# Altium PCB 2026.11.05.HMS.PD.CNHH.V6.0.PcbDoc (part 3 of 3)
Units mm, origin at the board's own origin, x right, y up, seen from the top; angles counter-clockwise.
Board outline 110 x 110 mm, 2 copper layers (Top Layer, Bottom Layer); 125 components, 86 nets, 366 pads, 882 vias.
Unrouted connection lines stored in the file: 779.
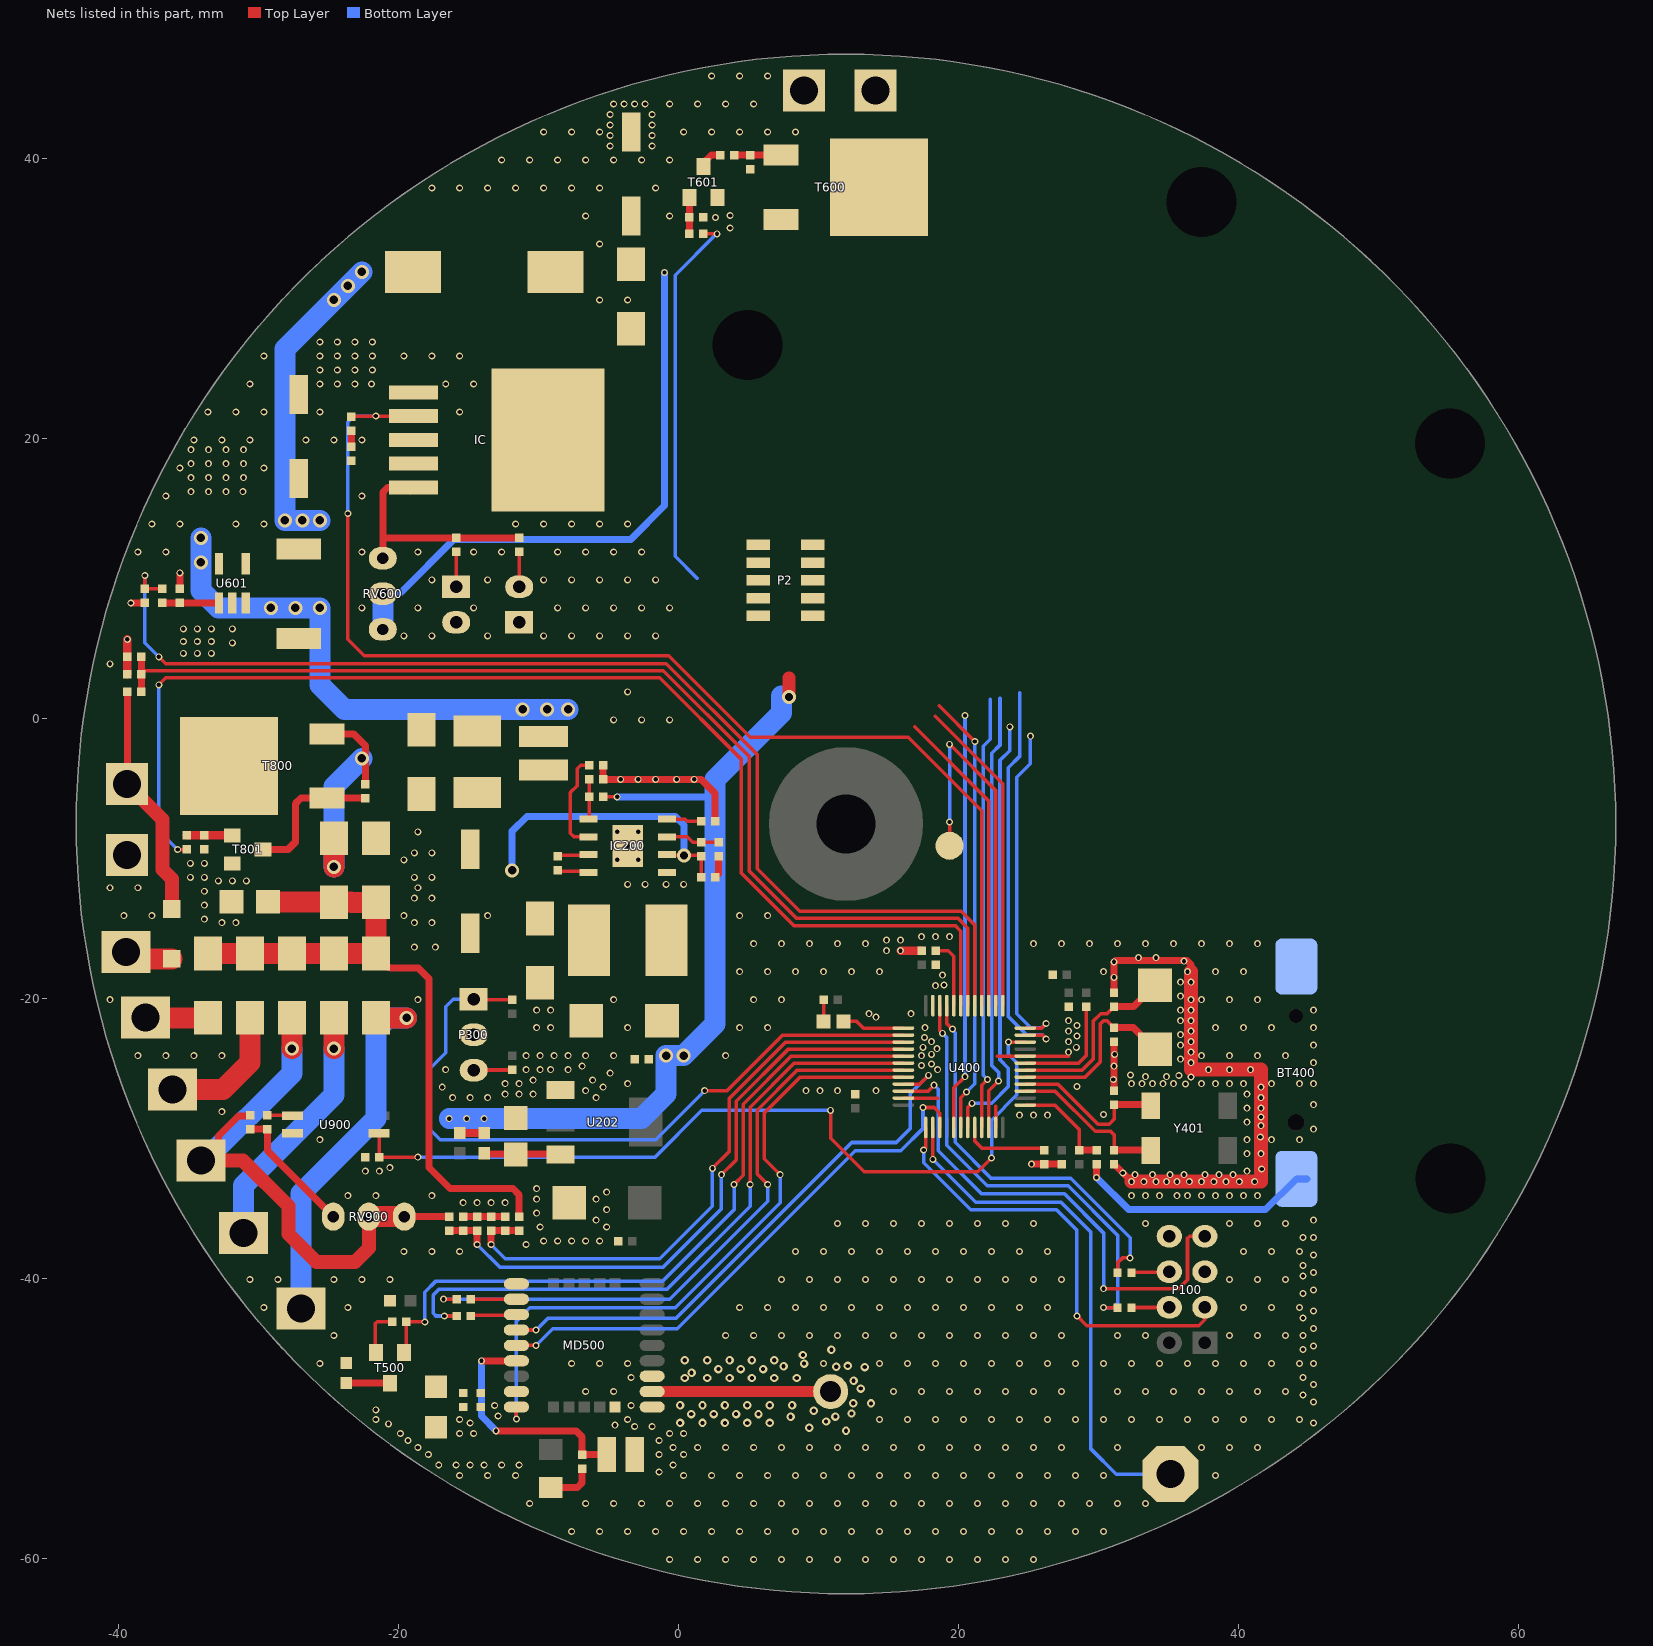
[diagram p2: the nets of this part, all layers, seen from the top]

## Via types
v1: diameter 0.5, hole 0.3, Top Layer to Bottom Layer, tented both sides, 802 vias
v2: diameter 0.6, hole 0.3, Top Layer to Bottom Layer, tented both sides, 48 vias
v3: diameter 1, hole 0.6, Top Layer to Bottom Layer, tented both sides, 32 vias

## Nets (pads, with @x,y where several pads share a name; then routed paths per layer and width w, separated by ;. In a path a pad name is that pad's centre, name@x,y a point inside that pad or via, vN(x,y) a via of type N, cw(c..) or ccw(c..) an arc to the next point about the centre after c; other vN are vias at no path point) (continued)
GND: BT400.2 C201.1 C202.1 C203.2 C204.2 C205.1 C208.1 C209.2 C400.1 C401.1 C402.1 C403.1 C404.1 C405.1 C406.1 C407.1 C500.1 C501.1 C502.2 C503.2 C600.2 C601.1 C602.2 C603.1 C801.1 C802.2 C803.1 C900.1 D200.1 D.1 IC200.1 IC200.EPAD IC.1 MD500.1 MD500.10 MD500.12 MD500.28 P2.2 P100.5 P100.8 P300.2 P600.2 P601.1 P602.2 P800.2 R201.1 R203.1 R204.1 R205.1 R400.1 R405.1 R605.1 R607.1 R620.1 R803.1 R804.1 R806.1 R901.1 R902.1 T601.2 T801.2 T905.1 U202.1 U400.8 U400.23 U400.35 U400.47 U601.2 U900.2 | length 81.5
  Top Layer w0.254: U400.35@16.05,-27.1 18.5,-27.1 ; U400.47@22.65,-29.2 22.65,-27.675 ; 22.75,-24.1 U400.8@24.75,-24.1 27.875,-24.1
  Top Layer w0.5: v1(-39.15,8.275) C603.1@-38.15,8.275 ; R607.1@-35.65,9.275 v1(-35.65,10.425) ; C601.1@-23.4,19.425 R620.1@-23.4,20.575 ; C900.1@-15.4,-35.575 C801.1@-12.4,-35.575 ; R205.1@-5.4,-3.325 R203.1@-5.4,-4.325 v1(-4.15,-4.325) v1(-2.9,-4.325) v1(-1.65,-4.325) v1(-0.15,-4.325) v1(1.1,-4.325) 1.6,-4.325 2.6,-5.325 R204.1@2.6,-7.325 ; C205.1@2.6,-11.325 2.85,-11.075 R201.1@2.85,-9.825 ; v1(25.2,-31.825) R400.1@26.1,-31.825 C407.1@27.35,-31.825 ; C403.1@31.1,-31.825 v1(32.35,-33.075) ; C404.1@31.1,-26.575 C401.1@31.1,-23.075 ; C400.1@31.1,-19.575 v1(31.1,-17.368) 31.193,-17.275 36.307,-17.275 36.6,-17.568 v1@36.6,-18.075 ; v1(36.6,-25.6) 36.6,-25.075
  Top Layer w0.6: R804.1@-39.4,3.175 C803.1@-39.4,4.425 v1(-39.4,5.675) ; v1(15.85,-16.575) R405.1@17.35,-16.575
  Top Layer w1: v1(32.35,-33.075) v1(34.1,-33.075) v1(35.6,-33.075) v1(37.35,-33.075) v1(39.1,-33.075) 41.6,-33.075 v1(41.6,-29.075) v1(41.6,-27.825) v1(41.6,-26.325) 41.6,-25.075 v1(40.85,-25.075) v1(39.35,-25.075) v1(37.85,-25.075) 36.6,-25.075 v1(36.6,-24.575) v1(36.6,-23.075) v1(36.6,-21.575) v1(36.6,-20.075) v1(36.6,-18.825) v1@36.6,-18.075
  Top Layer w1.5: T905.1@-39.5,-16.65 -39,-17.15 D.1@-36.225,-17.15
  other v1: -0.65,-60.075 1.35,-60.075 3.35,-60.075 5.35,-60.075 7.35,-60.075 9.35,-60.075 11.35,-60.075 13.35,-60.075 15.35,-60.075 17.35,-60.075 19.35,-60.075 21.35,-60.075 23.35,-60.075 25.35,-60.075 -7.65,-58.075 -5.65,-58.075 -3.65,-58.075 -1.65,-58.075 0.35,-58.075 2.35,-58.075 4.35,-58.075 6.35,-58.075 8.35,-58.075 10.35,-58.075 12.35,-58.075 14.35,-58.075 16.35,-58.075 18.35,-58.075 20.35,-58.075 22.35,-58.075 24.35,-58.075 26.35,-58.075 28.35,-58.075 30.35,-58.075 -10.65,-56.075 -6.65,-56.075 -4.65,-56.075 -2.65,-56.075 -0.65,-56.075 1.35,-56.075 3.35,-56.075 5.35,-56.075 7.35,-56.075 9.35,-56.075 11.35,-56.075 13.35,-56.075 15.35,-56.075 17.35,-56.075 19.35,-56.075 21.35,-56.075 23.35,-56.075 25.35,-56.075 27.35,-56.075 29.35,-56.075 31.35,-56.075 33.35,-56.075 -15.65,-54.075 -13.65,-54.075 -11.65,-54.075 0.35,-54.075 2.35,-54.075 4.35,-54.075 6.35,-54.075 8.35,-54.075 10.35,-54.075 12.35,-54.075 14.35,-54.075 16.35,-54.075 18.35,-54.075 20.35,-54.075 22.35,-54.075 24.35,-54.075 26.35,-54.075 28.35,-54.075 30.35,-54.075 38.35,-54.075 -1.4,-53.825 -17.15,-53.325 -15.9,-53.325 -14.9,-53.325 -13.9,-53.325 -12.65,-53.325 -11.4,-53.325 -0.4,-53.325 -17.9,-52.575 -1.4,-52.575 0.35,-52.575 -18.65,-52.075 -0.4,-52.075 1.35,-52.075 3.35,-52.075 5.35,-52.075 7.35,-52.075 9.35,-52.075 11.35,-52.075 13.35,-52.075 15.35,-52.075 17.35,-52.075 19.35,-52.075 21.35,-52.075 23.35,-52.075 25.35,-52.075 27.35,-52.075 31.35,-52.075 37.35,-52.075 39.35,-52.075 41.35,-52.075 -19.35,-51.575 -1.4,-51.575 -19.9,-51.075 -15.65,-51.075 -14.65,-51.075 -0.65,-51.075 0.35,-51.075 -3.15,-50.575 -1.9,-50.575 -4.55,-50.475 -20.75,-50.375 -14.9,-50.325 45.35,-50.325 -21.65,-50.075 -15.65,-50.075 -3.65,-50.075 14.35,-50.075 16.35,-50.075 18.35,-50.075 20.35,-50.075 22.35,-50.075 24.35,-50.075 26.35,-50.075 28.35,-50.075 30.35,-50.075 32.35,-50.075 34.35,-50.075 36.35,-50.075 38.35,-50.075 40.35,-50.075 42.35,-50.075 44.35,-50.075 -12.9,-49.825 -21.65,-49.375 -13.15,-49.075 -3.4,-49.075 45.35,-48.825 44.6,-48.325 -6.65,-48.075 -4.65,-48.075 15.35,-48.075 17.35,-48.075 19.35,-48.075 21.35,-48.075 23.35,-48.075 25.35,-48.075 27.35,-48.075 31.35,-48.075 33.35,-48.075 35.35,-48.075 37.35,-48.075 39.35,-48.075 41.35,-48.075 43.35,-48.075 45.35,-47.575 -3.4,-47.075 44.6,-47.075 -25.65,-46.075 -7.65,-46.075 -5.65,-46.075 -3.65,-46.075 10.35,-46.075 14.35,-46.075 16.35,-46.075 18.35,-46.075 20.35,-46.075 22.35,-46.075 24.35,-46.075 26.35,-46.075 28.35,-46.075 30.35,-46.075 32.35,-46.075 34.35,-46.075 36.35,-46.075 38.35,-46.075 40.35,-46.075 42.35,-46.075 44.35,-46.075 45.35,-46.075 44.6,-45.075 45.35,-44.825 -24.65,-44.075 3.35,-44.075 5.35,-44.075 7.35,-44.075 9.35,-44.075 11.35,-44.075 13.35,-44.075 15.35,-44.075 17.35,-44.075 19.35,-44.075 21.35,-44.075 23.35,-44.075 25.35,-44.075 27.35,-44.075 31.35,-44.075 33.35,-44.075 39.35,-44.075 41.35,-44.075 43.35,-44.075 44.6,-44.075 45.35,-43.575 44.6,-42.825 45.35,-42.325 -29.65,-42.075 -23.65,-42.075 4.35,-42.075 6.35,-42.075 8.35,-42.075 10.35,-42.075 12.35,-42.075 14.35,-42.075 16.35,-42.075 18.35,-42.075 20.35,-42.075 22.35,-42.075 24.35,-42.075 26.35,-42.075 40.35,-42.075 42.35,-42.075 44.35,-42.075 44.6,-41.075 45.35,-40.825 -30.65,-40.075 -28.65,-40.075 -24.65,-40.075 -22.65,-40.075 -20.65,-40.075 7.35,-40.075 9.35,-40.075 11.35,-40.075 13.35,-40.075 15.35,-40.075 17.35,-40.075 19.35,-40.075 21.35,-40.075 23.35,-40.075 25.35,-40.075 27.35,-40.075 39.35,-40.075 41.35,-40.075 43.35,-40.075 44.6,-39.825 45.35,-39.575 44.6,-39.075 45.35,-38.325 -19.65,-38.075 -17.65,-38.075 -15.65,-38.075 8.35,-38.075 10.35,-38.075 12.35,-38.075 14.35,-38.075 16.35,-38.075 18.35,-38.075 20.35,-38.075 22.35,-38.075 24.35,-38.075 26.35,-38.075 40.35,-38.075 42.35,-38.075 44.35,-38.075 -10.9,-37.575 -9.65,-37.325 -8.65,-37.325 -7.65,-37.325 -6.65,-37.325 -5.65,-37.325 44.6,-37.075 45.35,-37.075 -9.9,-36.325 -5.15,-36.325 11.35,-36.075 13.35,-36.075 15.35,-36.075 17.35,-36.075 19.35,-36.075 21.35,-36.075 23.35,-36.075 25.35,-36.075 33.35,-36.075 39.35,-36.075 41.35,-36.075 43.35,-36.075 -5.9,-35.825 45.35,-35.825 -10.15,-35.325 -5.15,-35.075 -15.4,-34.575 -14.4,-34.575 -13.4,-34.575 -12.4,-34.575 -10.15,-34.325 -5.9,-34.325 -23.65,-34.075 -21.65,-34.075 -17.65,-34.075 32.35,-34.075 33.35,-34.075 34.35,-34.075 35.6,-34.075 36.35,-34.075 37.35,-34.075 38.35,-34.075 39.35,-34.075 40.35,-34.075 41.35,-34.075 -5.15,-33.825 -10.15,-33.575 33.225,-33.075 34.85,-33.075 36.475,-33.075 38.225,-33.075 40.05,-33.075 41.15,-33.075 32.6,-32.575 33.85,-32.575 35.1,-32.575 36.1,-32.575 37.6,-32.575 38.6,-32.575 39.6,-32.575 31.725,-32.45 -22.4,-32.325 -21.4,-32.325 40.6,-32.325 41.65,-32.175 -20.65,-32.075 40.6,-31.075 41.6,-31.075 -25.65,-30.075 40.6,-30.075 42.35,-30.075 44.35,-30.075 41.55,-29.875 45.35,-29.325 40.6,-28.825 41.6,-28.45 24.35,-28.325 25.35,-28.325 26.35,-28.325 30.35,-28.275 -32.65,-28.075 40.6,-27.825 45.35,-27.575 -16.15,-27.075 -14.9,-27.075 -13.65,-27.075 -5.9,-27.075 41.6,-27.075 -12.4,-26.825 -11.4,-26.825 -10.4,-26.825 40.6,-26.825 -6.65,-26.575 9.1,-26.575 10.1,-26.575 11.35,-26.575 14.1,-26.575 -16.9,-26.325 -5.4,-26.325 28.45,-26.275 36.2,-26.1 -12.4,-26.075 -11.4,-26.075 -3.65,-26.075 32.35,-26.075 33.1,-26.075 33.85,-26.075 34.6,-26.075 35.35,-26.075 37.35,-26.075 38.35,-26.075 39.35,-26.075 40.35,-26.075 42.35,-26.075 44.35,-26.075 45.35,-26.075 -10.4,-25.825 -6.15,-25.825 31.05,-25.775 33.35,-25.575 34.85,-25.575 35.725,-25.5 32.275,-25.45 -4.9,-25.325 -16.65,-25.075 -10.9,-25.075 -9.9,-25.075 -9.15,-25.075 -7.9,-25.075 18.5,-25.075 -6.9,-24.825 31.1,-24.825 17.35,-24.775 18.05,-24.675 45.35,-24.575 35.85,-24.325 -38.65,-24.075 -36.65,-24.075 -34.65,-24.075 -32.65,-24.075 -10.9,-24.075 -9.9,-24.075 -8.9,-24.075 -7.9,-24.075 -6.65,-24.075 -4.65,-24.075 3.35,-24.075 17.35,-24.075 37.35,-24.075 39.35,-24.075 41.35,-24.075 43.35,-24.075 18.05,-23.975 31.15,-23.975 27.85,-23.825 36.6,-23.825 18.45,-23.575 17.45,-23.475 28.4,-23.475 35.85,-23.325 45.35,-23.325 18.05,-23.075 27.85,-23.075 17.55,-22.775 28.45,-22.675 35.85,-22.575 27.85,-22.325 36.6,-22.325 -10.15,-22.075 -9.15,-22.075 -3.65,-22.075 4.35,-22.075 6.35,-22.075 17.6,-22.075 38.35,-22.075 40.35,-22.075 42.35,-22.075 45.35,-22.075 28.45,-21.925 27.85,-21.575 35.85,-21.575 14.1,-21.325 13.6,-21.075 16.6,-21.075 -10.15,-20.825 -9.15,-20.825 35.85,-20.825 36.6,-20.825 45.35,-20.825 -40.65,-20.075 -18.65,-20.075 -4.65,-20.075 5.35,-20.075 7.35,-20.075 37.35,-20.075 39.35,-20.075 41.35,-20.075 35.85,-19.825 18.35,-19.075 18.95,-19.025 35.85,-18.825 31.1,-18.471 18.85,-18.325 4.35,-18.075 6.35,-18.075 8.35,-18.075 10.35,-18.075 12.35,-18.075 14.35,-18.075 30.35,-18.075 36.35,-18.075 38.35,-18.075 40.35,-18.075 36.1,-17.325 32.85,-17.075 34.1,-17.075 14.85,-16.575 -18.9,-16.325 -17.4,-16.325 5.35,-16.075 7.35,-16.075 9.35,-16.075 11.35,-16.075 13.35,-16.075 25.35,-16.075 27.35,-16.075 29.35,-16.075 31.35,-16.075 33.35,-16.075 35.35,-16.075 37.35,-16.075 39.35,-16.075 41.35,-16.075 14.85,-15.825 15.85,-15.825 17.35,-15.575 18.35,-15.575 19.35,-15.575 -32.65,-14.575 -31.65,-14.575 -18.9,-14.575 -17.65,-14.575 -33.9,-14.325 -39.65,-14.075 -37.65,-14.075 -19.65,-14.075 -13.65,-14.075 4.35,-14.075 6.35,-14.075 -33.9,-13.325 -18.9,-12.825 -17.65,-12.825 -33.9,-12.325 -40.65,-12.075 -38.65,-12.075 -18.65,-12.075 -3.65,-11.825 -2.4,-11.825 -0.9,-11.825 0.35,-11.825 -32.9,-11.575 -31.9,-11.575 -30.9,-11.575 -34.9,-11.325 -33.9,-11.325 -18.9,-11.325 -17.65,-11.325 -34.9,-10.325 -33.9,-10.325 -19.65,-10.075 -4.4,-10.075 -2.9,-10.075 -18.9,-9.575 -17.65,-9.575 -3.65,-9.075 -18.65,-8.075 -4.4,-8.075 -2.9,-8.075 -4.65,-0.075 -2.65,-0.075 -0.65,-0.075 -3.65,1.925 -40.65,3.925 -35.4,4.675 -34.4,4.675 -33.4,4.675 -31.9,5.425 -35.4,5.525 -34.4,5.525 -33.4,5.525 -19.65,5.925 -17.65,5.925 -13.65,5.925 -9.65,5.925 -7.65,5.925 -5.65,5.925 -3.65,5.925 -1.65,5.925 -35.4,6.425 -34.4,6.425 -33.4,6.425 -31.9,6.425 -22.65,7.925 -18.65,7.925 -14.65,7.925 -8.65,7.925 -6.65,7.925 -4.65,7.925 -2.65,7.925 -0.65,7.925 -17.65,9.925 -13.65,9.925 -9.65,9.925 -7.65,9.925 -5.65,9.925 -3.65,9.925 -1.65,9.925 -38.65,11.925 -36.65,11.925 -22.65,11.925 -18.65,11.925 -14.65,11.925 -12.65,11.925 -8.65,11.925 -6.65,11.925 -4.65,11.925 -2.65,11.925 -37.65,13.925 -35.65,13.925 -31.65,13.925 -29.65,13.925 -11.65,13.925 -9.65,13.925 -7.65,13.925 -5.65,13.925 -3.65,13.925 -36.65,15.925 -22.65,15.925 -34.85,16.225 -33.6,16.225 -32.35,16.225 -31.15,16.225 -34.85,17.225 -33.6,17.225 -32.35,17.225 -31.1,17.225 -35.65,17.925 -29.65,17.925 -34.85,18.225 -33.6,18.225 -32.35,18.225 -31.1,18.225 -34.85,19.225 -33.6,19.225 -32.35,19.225 -31.1,19.225 -34.65,19.925 -32.65,19.925 -30.65,19.925 -26.65,19.925 -24.65,19.925 -22.65,19.925 -33.65,21.925 -31.65,21.925 -29.65,21.925 -25.65,21.925 -15.65,21.925 -30.65,23.925 -25.65,23.925 -24.4,23.925 -23.15,23.925 -21.95,23.925 -16.65,23.925 -14.65,23.925 -25.65,24.925 -24.4,24.925 -23.15,24.925 -21.9,24.925 -29.65,25.925 -25.65,25.925 -24.4,25.925 -23.15,25.925 -21.9,25.925 -19.65,25.925 -17.65,25.925 -15.65,25.925 -25.65,26.925 -24.4,26.925 -23.15,26.925 -21.9,26.925 -5.65,29.925 -3.65,29.925 -5.65,33.925 3.675,35.075 2.625,35.825 -6.65,35.925 -0.65,35.925 3.675,35.95 -17.65,37.925 -15.65,37.925 -13.65,37.925 -11.65,37.925 -9.65,37.925 -7.65,37.925 -5.65,37.925 -1.65,37.925 -12.65,39.925 -10.65,39.925 -8.65,39.925 -6.65,39.925 -4.65,39.925 -2.65,39.925 -0.65,39.925 -4.9,40.925 -1.9,40.925 -4.9,41.675 -1.9,41.675 -9.65,41.925 -7.65,41.925 -5.65,41.925 0.35,41.925 2.35,41.925 4.35,41.925 6.35,41.925 8.35,41.925 -4.9,42.425 -1.9,42.425 -4.9,43.175 -1.9,43.175 -4.65,43.925 -3.9,43.925 -3.15,43.925 -2.4,43.925 -0.65,43.925 1.35,43.925 3.35,43.925 5.35,43.925 2.35,45.925 4.35,45.925 6.35,45.925
  other v2: 11.946,-50.871 9.326,-50.659 0.095,-50.309 1.695,-50.309 3.295,-50.309 4.895,-50.309 6.495,-50.309 10.528,-50.214 7.99,-49.871 11.19,-49.861 0.895,-49.685 2.495,-49.685 4.095,-49.685 5.695,-49.685 12.341,-49.642 9.647,-49.439 0.095,-49.048 1.695,-49.048 3.295,-49.048 4.895,-49.048 6.495,-49.048 8.095,-49.048 13.733,-48.921 12.472,-48.903 13.002,-47.859 12.495,-47.303 0.428,-47.102 2.028,-47.102 3.628,-47.102 5.228,-47.102 6.828,-47.102 8.428,-47.102 0.914,-46.73 2.828,-46.465 4.428,-46.465 6.028,-46.465 13.287,-46.322 11.25,-46.297 7.49,-46.269 12.074,-46.238 8.951,-46.074 0.428,-45.841 2.028,-45.841 3.628,-45.841 5.228,-45.841 6.828,-45.841 8.866,-45.462 10.904,-45.084
GPS_PWR: L501.1 L502.2 R503.2 T500.2 | length 3.2
  Top Layer w0.254: T500.2@-21.65,-45.275 -21.7,-45.225 -21.7,-43.224 -21.551,-43.075 R503.2@-20.65,-43.075
GPS_VCC: C500.2 C501.2 C502.1 L501.2 MD500.8 T500.3 | length 3.1
  Top Layer w0.5: L501.2@-23.75,-47.475 T500.3@-20.65,-47.475
LED: D400.2 U400.25 | length 4.5
  Top Layer w0.254: D400.2@11.775,-21.625 12.7,-21.625 13.175,-22.1 U400.25@16.05,-22.1
LED_PWR: C600.1 D600.2 R602.2 RV600.2 RV600.3 T600.3 | length 41.9
  Bottom Layer w0.5: RV600.2@-21.15,8.925 -21.054,9.021 -19.854,9.021 -16.05,12.825 -3.425,12.825 -1.025,15.225 v1(-1.025,31.875)
  Bottom Layer w1.5: RV600.3@-21.15,6.385 RV600.2@-21.15,8.925
LED_VCC: C601.2 C602.1 IC.4 L601.1 R603.2 U601.4 | length 22.5
  Bottom Layer w1.5: v3(-25.65,14.175) v3(-26.9,14.175) v3(-28.15,14.175) -28.15,26.425 v3(-22.65,31.925)
  other v3: -24.65,29.925 -23.65,30.925
Net`_2: `.2 P300.3 | length 2.8
  Top Layer w0.254: P300.3@-14.65,-25.115 -14.63,-25.095 -11.92,-25.095 `.2@-11.9,-25.075
NetAT500_1: AT500.1 MD500.11 | length 12.8
  Top Layer w0.8: MD500.11@-1.9,-48.075 AT500.1@10.85,-48.075
NetC200_1: C200.1 D200.2 IC200.8 L201.1 | length 2.3
  Top Layer w0.254: C200.1@-8.65,-10.825 -8.573,-10.902 -6.531,-10.902 IC200.8@-6.454,-10.98
NetC200_2: C200.2 IC200.7 | length 2.2
  Top Layer w0.254: C200.2@-8.65,-9.825 -8.593,-9.767 -6.511,-9.767 IC200.7@-6.454,-9.71
NetC201_2: C201.2 L202.2 U202.3 | length 5.5
  Top Layer w0.5: L202.2@-13.9,-31.048 -13.861,-31.086 -8.487,-31.086 U202.3@-8.448,-31.125
NetC204_1: C204.1 C205.2 IC200.2 L200.2 R200.2 | length 21.9
  Top Layer w0.254: IC200.2@-0.847,-9.71 -0.789,-9.767 v3(0.377,-9.767) 1.542,-9.767 R200.2@1.6,-9.825 C205.2@1.6,-11.325
  Bottom Layer w0.5: v3(-11.9,-10.825) -11.9,-8.025 -10.85,-6.975 -0.25,-6.975 0.377,-7.602 v3(0.377,-9.767)
NetC503_1: C503.1 MD500.6 R502.1 | length 17.3
  Top Layer w0.5: v1(-14.1,-45.875) MD500.6@-11.6,-45.875 ; v1(-13.05,-50.875) -7.35,-50.875 -6.9,-51.325 R502.1@-6.9,-52.575 C503.1@-5.15,-52.575
  Bottom Layer w0.5: v1(-14.1,-45.875) -14.1,-49.825 v1(-13.05,-50.875)
NetC603_2: C603.2 R606.2 U400.17 | length 85.2
  Top Layer w0.254: v1(-38.15,10.225) C603.2@-38.15,9.275 R606.2@-36.9,9.275 ; v1(-37.15,4.425) -36.666,3.941 -36.25,3.941 -1.166,3.941 -0.891,3.941 5.6,-2.55 5.6,-10.725 8.634,-13.759 20.171,-13.759 21.15,-14.738 U400.17@21.15,-20.5
  Bottom Layer w0.254: v1(-38.15,10.225) -38.15,5.425 v1(-37.15,4.425)
NetC801_2: C801.2 R800.1 R803.2 U400.27 | length 43.1
  Top Layer w0.254: v1(2.402,-32.123) 3.6,-30.925 3.6,-27.132 7.632,-23.1 U400.27@16.05,-23.1
  Top Layer w0.5: v1(-13.4,-37.575) R803.2@-13.4,-36.575 R800.1@-11.4,-36.575
  Bottom Layer w0.254: v1(-13.4,-37.575) -12.4,-38.575 -1.35,-38.575 2.402,-34.823 v1(2.402,-32.123)
NetC803_2: C803.2 R802.1 R804.2 U400.18 | length 79.5
  Top Layer w0.254: R804.2@-38.4,3.433 -1.658,3.433 -1.108,3.433 5.05,-2.725 5.05,-10.893 8.424,-14.267 19.96,-14.267 20.65,-14.957 U400.18@20.65,-20.5
  Top Layer w0.5: R802.1@-38.4,1.925 -38.4,2.425 -38.4,3.433 C803.2@-38.4,4.425
NetC900_2: C900.2 R900.1 R901.2 U400.28 | length 44.5
  Top Layer w0.254: v1(3.046,-32.579) 4.1,-31.525 4.1,-27.339 7.839,-23.6 U400.28@16.05,-23.6
  Top Layer w0.5: R900.1@-16.4,-36.575 R901.2@-14.4,-36.575 v1(-14.4,-37.575)
  Bottom Layer w0.254: v1(-14.4,-37.575) -12.8,-39.175 -1.101,-39.175 3.046,-35.027 v1(3.046,-32.579)
NetD400_1: D400.1 R404.2 | length 1.6
  Top Layer w0.254: D400.1@10.325,-21.625 10.35,-21.6 R404.2@10.35,-20.075
NetD500_2: D500.2 R502.2 | length 3.4
  Top Layer w0.5: D500.2@-9.15,-54.925 -7.25,-54.925 -6.9,-54.575 R502.2@-6.9,-53.575
NetD600_1: D600.1 IC.3 IC.6 L601.2
NetD800_2: D800.2 R801.2 T800.3 | length 16.5
  Top Layer w0.5: T800.3@-25.15,-1.075 -23.25,-1.075 -22.4,-1.925 R801.2@-22.4,-4.675
  Top Layer w1.5: v3(-24.65,-10.575) D800.2@-24.65,-8.525
  Bottom Layer w1.5: v3(-24.65,-10.575) -24.65,-4.825 v3(-22.65,-2.825)
NetD900_1: D900.1 T900.1 | length 4.4
  Top Layer w1.5: T900.1@-38.092,-21.361 -38.085,-21.368 -33.657,-21.368 D900.1@-33.65,-21.375
NetD902_1: D902.1 T901.1 | length 9.5
  Top Layer w1.5: T901.1@-36.162,-26.492 -32.567,-26.492 -30.65,-24.575 D902.1@-30.65,-21.375
NetD905_1: D905.1 T903.1 | length 18
  Top Layer w1.5: v3(-24.65,-23.575) D905.1@-24.65,-21.375
  Bottom Layer w1.5: T903.1@-31.107,-36.728 -31.107,-33.332 -24.65,-26.875 v3(-24.65,-23.575)
NetD906_1: D906.1 T904.1 | length 26.9
  Top Layer w1.5: D906.1@-21.65,-21.375 v3(-19.45,-21.375)
  Bottom Layer w1.5: T904.1@-26.979,-42.138 -26.979,-33.904 -21.65,-28.575 -21.65,-22.254 -20.771,-21.375 v3(-19.45,-21.375)
NetIC200_3: IC200.3 R200.1 R201.2 | length 3.9
  Top Layer w0.254: IC200.3@-0.847,-8.44 0.615,-8.44 1,-8.825 R201.2@2.85,-8.825
NetIC200_4: IC200.4 R204.2 | length 2.5
  Top Layer w0.254: IC200.4@-0.847,-7.17 0.445,-7.17 0.6,-7.325 R204.2@1.6,-7.325
NetIC200_5: IC200.5 R202.1 R203.2 | length 2.9
  Top Layer w0.254: IC200.5@-6.454,-7.17 -6.4,-7.116 R203.2@-6.4,-4.325
NetIC200_6: IC200.6 R205.2 | length 7.2
  Top Layer w0.254: IC200.6@-6.511,-8.383 IC200.6@-6.454,-8.44 -7.485,-8.44 -7.75,-8.175 -7.75,-5.275 -7.25,-4.775 -7.25,-3.575 -7,-3.325 R205.2@-6.4,-3.325
NetIC_2: IC.2 R620.2 U400.16 | length 86.4
  Top Layer w0.254: v1(-23.65,14.675) -23.65,5.675 -22.475,4.5 -0.725,4.5 5.1,-1.325 16.4,-1.325 21.65,-6.575 U400.16@21.65,-20.5 ; R620.2@-23.4,21.575 -23.375,21.6 -21.675,21.6 v1(-21.65,21.625) IC.2@-18.965,21.625
  Bottom Layer w0.254: v1(-23.65,14.675) -23.65,21.175 -23.2,21.625 v1(-21.65,21.625)
NetIC_5: IC.5 R600.2 R601.2 RV600.1 | length 17.1
  Top Layer w0.5: RV600.1@-21.15,11.465 -21.15,12.925 ; IC.5@-19.215,16.275 IC.5@-18.965,16.525 -20.8,16.525 -21.15,16.175 -21.15,12.925 ; R600.2@-11.4,12.925 -21.15,12.925
NetMD500_2: MD500.2 R500.1 | length 3.3
  Top Layer w0.254: R500.1@-14.85,-41.475 MD500.2@-11.6,-41.475
NetMD500_3: MD500.3 R501.1 | length 3.3
  Top Layer w0.254: R501.1@-14.85,-42.675 -14.8,-42.625 -11.65,-42.625 MD500.3@-11.6,-42.575
NetMD500_4: MD500.4 U400.33 | length 40.5
  Top Layer w0.254: MD500.4@-11.6,-43.675 v1(-10.193,-43.675) ; U400.33@16.05,-26.1 17.225,-26.1 v1(17.85,-25.475)
  Bottom Layer w0.254: v1(-10.193,-43.675) -9.343,-42.825 -0.2,-42.825 12.35,-30.275 15.55,-30.275 16.55,-29.275 16.55,-26.775 v1(17.85,-25.475)
NetMD500_5: MD500.5 U400.39 | length 39.4
  Top Layer w0.254: MD500.5@-11.6,-44.775 v1(-10.193,-44.775) ; v1(17.45,-27.775) 18.25,-27.775 18.65,-28.175 U400.39@18.65,-29.2
  Bottom Layer w0.254: v1(-10.193,-44.775) -8.993,-43.575 -0.101,-43.575 12.599,-30.875 15.85,-30.875 17.45,-29.275 v1(17.45,-27.775)
NetMD500_9: MD500.9 U400.32 | length 48.2
  Top Layer w0.254: v1(-11.6,-50.025) MD500.9@-11.6,-49.175 ; v1(7.25,-32.579) 6.1,-31.429 6.1,-28.168 8.668,-25.6 U400.32@16.05,-25.6
  Bottom Layer w0.254: v1@-11.6,-50.125 v1(-11.6,-50.025) -11.6,-43.025 -10.65,-42.075 -0.25,-42.075 7.25,-34.575 v1(7.25,-32.579)
NetP2_4: P2.4 U400.45 | length 31.1
  Top Layer w0.254: U400.45@21.65,-29.2 21.65,-26.175 v1(22.05,-25.775)
  Bottom Layer w0.254: v1(22.05,-25.775) 21.75,-25.475 21.75,-1.975 22.25,-1.475 22.25,1.38
NetP2_5: P2.5 U400.13 | length 22.7
  Top Layer w0.254: 18.325,0.175 23.15,-4.65 U400.13@23.15,-20.5
NetP2_6: P2.6 U400.15 | length 22.1
  Top Layer w0.254: 16.85,-0.575 22.15,-5.875 U400.15@22.15,-20.5
NetP2_7: P2.7 U400.46 | length 31.4
  Top Layer w0.254: U400.46@22.15,-29.2 22.15,-26.575 v1(22.85,-25.875)
  Bottom Layer w0.254: v1(22.85,-25.875) 22.85,-25.275 22.35,-24.775 22.35,-2.475 22.95,-1.875 22.95,1.458
NetP2_8: P2.8 U400.41 | length 29.8
  Top Layer w0.254: U400.41@19.65,-29.2 19.65,-26.375 v1(20.45,-25.575)
  Bottom Layer w0.254: v1(20.45,-25.575) v1(20.45,0.225)
NetP2_9: P2.9 U400.43 | length 31.2
  Top Layer w0.254: U400.43@20.65,-29.2 20.65,-27.775 v1(20.95,-27.475)
  Bottom Layer w0.254: v1(20.95,-27.475) 22.35,-27.475 23.55,-26.275 23.55,-24.975 22.95,-24.375 22.95,-2.975 23.65,-2.275 v1(23.65,-0.575)
NetP2_10: P2.10 U400.42 | length 31.6
  Top Layer w0.254: 18.6,0.925 v1(21.15,-1.625) ; U400.42@20.15,-29.2 20.15,-27.075 v1(20.55,-26.675)
  Bottom Layer w0.254: v1(20.55,-26.675) 21.15,-26.075 v1(21.15,-1.625)
NetP100_3: P100.3 U400.37 | length 32.2
  Top Layer w0.254: v1(17.496,-30.821) 17.65,-30.668 U400.37@17.65,-29.2 ; v1(28.45,-42.667) 29.158,-43.375 37.15,-43.375 37.59,-42.935 P100.3@37.59,-42.055
  Bottom Layer w0.254: v1(17.496,-30.821) 17.496,-31.721 20.85,-35.075 26.985,-35.075 28.45,-36.54 v1(28.45,-42.667)
NetP100_4: P100.4 R102.1 | length 2.7
  Top Layer w0.254: R102.1@32.35,-42.075 32.36,-42.065 35.04,-42.065 P100.4@35.05,-42.055
NetP100_6: P100.6 R100.1 | length 2.7
  Top Layer w0.254: R100.1@32.35,-39.575 32.38,-39.545 35.02,-39.545 P100.6@35.05,-39.515
NetP100_7: P100.7 U400.34 | length 35.9
  Top Layer w0.254: U400.34@16.05,-26.6 17.825,-26.6 v1(18.246,-26.179) ; v1(30.35,-40.721) 35.704,-40.721 36.35,-40.075 36.35,-37.124 36.499,-36.975 P100.7@37.59,-36.975
  Bottom Layer w0.254: v1(18.246,-26.179) 18.55,-26.484 18.55,-30.875 21.625,-33.95 27.558,-33.95 30.35,-36.742 v1(30.35,-40.721)
NetP300_1: P300.1 R300.1 U400.26 | length 51.4
  Top Layer w0.254: P300.1@-14.65,-20.035 -14.61,-20.075 R300.1@-11.9,-20.075 ; v1(1.85,-26.575) 3.45,-26.575 7.425,-22.6 U400.26@16.05,-22.6
  Bottom Layer w0.254: P300.1@-14.65,-20.035 -16.11,-20.035 -16.65,-20.575 -16.65,-23.875 -17.75,-24.975 -17.75,-29.375 -17.05,-30.075 -1.65,-30.075 v1(1.85,-26.575)
NetP600_1: P600.1 T600.2
NetP601_2: P601.2 R600.1 | length 2.5
  Top Layer w0.254: P601.2@-11.4,9.425 R600.1@-11.4,11.925
NetP602_1: P602.1 R601.1 | length 2.5
  Top Layer w0.254: P602.1@-15.9,9.425 R601.1@-15.9,11.925
NetR100_2: R100.2 U400.21 | length 28.5
  Top Layer w0.254: U400.21@19.15,-20.5 19.15,-21.775 v1(19.55,-22.175) ; R100.2@31.35,-39.575 31.35,-38.875 31.7,-38.525 v1(32.25,-38.525)
  Bottom Layer w0.254: v1(19.55,-22.175) 19.55,-22.242 19.75,-22.442 19.75,-30.266 22.309,-32.825 28,-32.825 32.25,-37.075 v1(32.25,-38.525)
NetR102_2: R102.2 U400.22 | length 32
  Top Layer w0.254: U400.22@18.65,-20.5 18.65,-22.275 v1(18.85,-22.475) ; v1(30.35,-42.075) R102.2@31.35,-42.075
  Bottom Layer w0.254: v1(18.85,-22.475) 19.15,-22.775 19.15,-30.475 22.05,-33.375 27.832,-33.375 31.35,-36.893 31.35,-41.775 31.05,-42.075 v1(30.35,-42.075)
NetR400_2: R400.2 U400.44 | length 6.1
  Top Layer w0.254: U400.44@21.15,-29.2 21.15,-30.175 21.65,-30.675 R400.2@26.1,-30.675
NetR401_1: R401.1 U400.7 | length 8.1
  Top Layer w0.254: U400.7@24.75,-24.6 28.575,-24.6 29.1,-24.075 R401.1@29.1,-20.575
NetR402_2: R402.2 R403.2 U400.1 | length 7.3
  Top Layer w0.254: U400.1@24.75,-27.6 26.875,-27.6 28.6,-29.325 R403.2@28.6,-30.825
  Top Layer w0.5: R403.2@28.6,-30.825 R402.2@29.85,-30.825
NetR405_2: R405.2 U400.20 | length 5
  Top Layer w0.254: R405.2@18.35,-16.575 19.25,-16.575 19.65,-16.975 U400.20@19.65,-20.5
NetR500_2: R500.2 U400.31 | length 45.5
  Top Layer w0.254: v1(-16.8,-41.475) R500.2@-15.85,-41.475 ; v1(6.35,-33.275) 5.6,-32.525 5.6,-27.961 8.461,-25.1 U400.31@16.05,-25.1
  Bottom Layer w0.254: v1(-16.8,-41.475) -0.65,-41.475 6.35,-34.475 v1(6.35,-33.275)
NetR501_2: R501.2 U400.30 | length 47.7
  Top Layer w0.254: v1(-16.75,-42.675) R501.2@-15.85,-42.675 ; v1(5.1,-33.275) 5.1,-27.753 8.253,-24.6 U400.30@16.05,-24.6
  Bottom Layer w0.254: v1(-16.75,-42.675) -17.35,-42.675 -17.55,-42.475 -17.55,-41.175 -17.15,-40.775 -0.85,-40.775 5.1,-34.825 v1(5.1,-33.275)
NetR503_1: R503.1 T500.1@-19.65,-45.275 U400.29 | length 51
  Top Layer w0.254: T500.1@-19.65,-45.275 -19.475,-45.1 R503.1@-19.475,-43.075 v1@-18.15,-43.075 ; v1(3.95,-33.275) 4.6,-32.625 4.6,-27.546 8.046,-24.1 U400.29@16.05,-24.1
  Bottom Layer w0.254: v1(-18.15,-43.113) -18.15,-40.975 -17.35,-40.175 -1.15,-40.175 3.95,-35.075 v1(3.95,-33.275)
NetR602_1: R602.1 R608.1 T600.1 | length 3.4
  Top Layer w0.5: R608.1@3.95,40.275 R602.1@5.1,40.275 T600.1@7.318,40.275
NetR604_1: R604.1 U400.11 | length 55.9
  Top Layer w0.254: R604.1@1.75,34.65 v1(2.725,34.65) ; U400.11@24.75,-22.6 25.975,-22.6 v1(26.25,-22.875)
  Bottom Layer w0.254: 1.325,10.025 -0.25,11.6 -0.25,31.7 2.7,34.65 v1(2.725,34.65) ; 24.35,1.85 24.35,-2.7 23.55,-3.5 23.55,-21.275 24.85,-22.575 25.95,-22.575 v1(26.25,-22.875)
NetR604_2: R604.2 R605.2 T601.1@0.75,37.25 | length 2.6
  Top Layer w0.5: R604.2@0.75,34.65 R605.2@0.75,35.825 T601.1@0.75,37.25
NetR606_1: R606.1 R607.2 U601.1 | length 4
  Top Layer w0.5: R606.1@-36.9,8.275 R607.2@-35.65,8.275 U601.1@-32.85,8.275
NetR608_2: R608.2 T601.3 | length 1.7
  Top Layer w0.5: T601.3@1.75,39.45 1.75,39.7 2.325,40.275 R608.2@2.95,40.275
NetR801_1: R801.1 T800.1 T801.3 | length 10.4
  Top Layer w0.5: T801.3@-29.7,-9.325 -27.9,-9.325 -27.4,-8.825 -27.4,-6.075 -27,-5.675 T800.1@-25.15,-5.675 R801.1@-22.4,-5.675
NetR805_1: R805.1 U400.19 | length 88.1
  Top Layer w0.254: v1(-37.15,2.425) -36.65,2.925 -36.25,2.925 -2.15,2.925 -1.35,2.925 4.45,-2.875 4.45,-11.012 8.213,-14.775 19.75,-14.775 20.15,-15.175 U400.19@20.15,-20.5 ; v1(-35.8,-9.35) -35.175,-9.35 R805.1@-35.15,-9.325
  Bottom Layer w0.254: v1(-37.15,2.425) -37.15,-8 v1(-35.8,-9.35)
NetR805_2: R805.2 R806.2 T801.1@-31.9,-8.325 | length 3.3
  Top Layer w0.6: R805.2@-35.15,-8.325 R806.2@-33.9,-8.325 T801.1@-31.9,-8.325
NetR902_2: R902.2 U400.10 U900.3 | length 60.6
  Top Layer w0.254: U900.3@-21.404,-29.627 -21.4,-29.631 R902.2@-21.4,-31.325 v1(-18.65,-31.325) ; v1(10.85,-27.975) 10.85,-29.975 13.25,-32.375 21.35,-32.375 v1(22.35,-31.375) ; v1(23.55,-23.1) U400.10@24.75,-23.1
  Bottom Layer w0.254: v1(-18.65,-31.325) -1.7,-31.325 1.65,-27.975 v1(10.85,-27.975) ; v1@22.35,-31.275 22.35,-28.675 24.15,-26.875 24.15,-24.575 23.55,-23.975 v1(23.55,-23.1)
NetR905_1: R905.1 U900.1 | length 1.8
  Top Layer w0.254: R905.1@-29.4,-28.325 -29.384,-28.341 -27.62,-28.341 U900.1@-27.604,-28.357
NetR905_2: R905.2 R.2 RV900.1 | length 9.4
  Top Layer w0.5: R.2@-30.625,-29.325 R905.2@-29.4,-29.325 -29.4,-30.865 RV900.1@-24.69,-35.575
NetT300_1: T300.1 U400.38 | length 37.6
  Top Layer w0.254: v1(18.15,-31.475) U400.38@18.15,-29.2
  Bottom Layer w0.254: v1(18.15,-31.475) 21.225,-34.55 27.309,-34.55 29.45,-36.691 29.45,-52.175 31.25,-53.975 T300.1@35.125,-53.975
NetT400_1: T400.1 U400.14 | length 27.3
  Top Layer w0.254: T400.1@19.35,-9.075 v1(19.35,-7.375) ; v1(19.35,-1.825) 22.65,-5.125 U400.14@22.65,-20.5
  Bottom Layer w0.254: v1(19.35,-7.375) v1(19.35,-1.825)
OSC32I: C403.2 U400.3 Y401.1 | length 11.4
  Top Layer w0.254: U400.3@24.75,-26.6 26.875,-26.6 29.75,-29.475 30.85,-29.475 31.1,-29.725 C403.2@31.1,-30.825
  Top Layer w0.5: C403.2@31.1,-30.825 33.7,-30.825 Y401.1@33.725,-30.85
OSC32O: C404.2 U400.4 Y401.4 | length 11.4
  Top Layer w0.254: U400.4@24.75,-26.1 27.082,-26.1 29.957,-28.975 30.75,-28.975 31.1,-28.625 C404.2@31.1,-27.575
  Top Layer w0.5: C404.2@31.1,-27.575 33.65,-27.575 Y401.4@33.725,-27.65
OSCI: C401.2 U400.5 Y400.1 | length 13.4
  Top Layer w0.254: U400.5@24.75,-25.6 29.032,-25.6 30.1,-24.532 30.1,-21.825 30.35,-21.575 30.6,-21.575 C401.2@31.1,-22.075
  Top Layer w0.5: C401.2@31.1,-22.075 32.5,-22.075 Y400.1@34.025,-23.6
OSCO: C400.2 U400.6 Y400.2 | length 13.4
  Top Layer w0.254: U400.6@24.75,-25.1 28.825,-25.1 29.6,-24.325 29.6,-21.618 30.143,-21.075 30.6,-21.075 C400.2@31.1,-20.575
  Top Layer w0.5: C400.2@31.1,-20.575 32.5,-20.575 Y400.2@34.025,-19.05
SOLAR_TOP: D904.1 R900.2 R.1 RV900.2 RV900.3 T902.1 | length 42.7
  Top Layer w0.5: T902.1@-34.13,-31.572 -34.125,-31.572 -32.875,-30.322 -32.875,-29.8 -31.45,-28.375 -30.675,-28.375 R.1@-30.625,-28.325 ; RV900.3@-19.61,-35.575 R900.2@-16.4,-35.575
  Top Layer w1: T902.1@-34.125,-31.572 -31.153,-31.572 -27.9,-34.825 -27.9,-36.825 -25.9,-38.825 -23.15,-38.825 -22.15,-37.825 RV900.2@-22.15,-35.575
  Top Layer w1.5: v3(-27.65,-23.575) D904.1@-27.65,-21.375 ; RV900.2@-22.15,-35.575 RV900.3@-19.61,-35.575
  Bottom Layer w1.5: T902.1@-34.13,-31.572 -33.88,-31.572 -27.65,-25.342 v3(-27.65,-23.575)
USART2.TX: P2.3 R1000.1 U400.12 | length 24.5
  Top Layer w0.254: U400.12@24.75,-22.1 25.925,-22.1 v1(26.25,-21.775)
  Bottom Layer w0.254: v1(25.12,-1.245) 25.12,-3.205 24.15,-4.175 24.15,-21.075 25.15,-22.075 25.95,-22.075 v1(26.25,-21.775)
V_BAT: D903.1 D.2 P800.1 R802.2 T800.2 | length 17
  Top Layer w0.5: P800.1@-39.425,-4.66 -39.4,-4.635 R802.2@-39.4,1.925
  Top Layer w1: P800.1@-39.425,-4.66 -36.9,-7.185 -36.9,-10.775 -36.225,-11.45 D.2@-36.225,-13.594
  Bottom Layer w1.5: P800.1@-39.425,-4.66 P800.1@-39.325,-4.56
V_SOLAR: C802.1 D800.1 D900.2 D901.1 D902.2 D904.2 D905.2 D906.2 R800.2 | length 48.6
  Top Layer w0.5: D906.2@-21.65,-16.775 -21.65,-16.975 -20.9,-17.725 -20.7,-17.725 -20.6,-17.825 -18.6,-17.825 -17.85,-18.575 -17.85,-32.075 -16.35,-33.575 -11.85,-33.575 -11.4,-34.025 -11.4,-35.525 R800.2@-11.4,-35.575
  Top Layer w1.5: D900.2@-33.65,-16.775 D902.2@-30.65,-16.775 D904.2@-27.65,-16.775 D905.2@-24.65,-16.775 D906.2@-21.65,-16.775 D901.1@-21.65,-14.004 ; C802.1@-29.35,-13.075 -29.325,-13.1 -23.425,-13.1 -23.4,-13.125 D901.1@-22.529,-13.125
V_SYSTEM: D901.2 D903.2 F200.1
VBAT: BT400.1 R402.1 | length 17.8
  Top Layer w0.5: v1(29.85,-32.775) R402.1@29.85,-31.825
  Bottom Layer w0.5: v1(29.85,-32.775) 32.15,-35.075 41.925,-35.075 BT400.1@44.125,-32.875 BT400.1@44.875,-32.875
VIN: F200.2 L200.1 R603.1 U601.3 U601.5 | length 36.7
  Bottom Layer w1.5: v3(-34.15,12.925) v3(-34.15,11.175) -34.15,9.175 -32.9,7.925 v3(-29.15,7.925) v3(-27.4,7.925) v3(-25.65,7.925) -25.65,2.425 -23.9,0.675 v3(-11.15,0.675) v3(-9.4,0.675) v3(-7.9,0.675)
VOUT: C202.2 C203.1 L201.2 L202.1 L203.1 P2.1 R202.2 | length 59.9
  Top Layer w0.254: R202.2@-5.4,-5.575 v1(-4.4,-5.575)
  Top Layer w0.6: L203.1@-15.65,-29.6 L202.1@-13.9,-29.6
  Top Layer w0.9: v3(7.875,1.552) 7.875,2.925
  Bottom Layer w0.5: v1(-4.4,-5.575) 2.6,-5.575
  Bottom Layer w1.5: v1(-16.4,-28.575) v1(-15.15,-28.575) -2.65,-28.575 -0.9,-26.825 v3(-0.9,-24.075) v3(0.35,-24.075) 2.6,-21.825 2.6,-5.575 2.6,-4.325 7.35,0.425 7.35,1.625
  other v1: -13.9,-28.575
pads on no net: BT400. MD500.7 MD500.13 MD500.14 MD500.15 MD500.16 MD500.17 MD500.18 MD500.19 MD500.20 MD500.21 MD500.22 MD500.23 MD500.24 MD500.25 MD500.26 MD500.27 P100.1 P100.2 T500.1@-19.634,-46.375 T601.1@0.734,38.35 T801.1@-30.8,-8.309 U400.0 U400.2 U400.40 Y401.2 Y401.3

## Polygon pours and split planes (outlines as drawn)
GND on Bottom Layer "GND_L02_P003" (solid, remove dead copper, pour order 7): 45.75,-14.713 45.75,-62.613 -43.15,-62.613 -43.15,47.387 12.35,47.387 12.35,31.157 0.275,31.157 0.275,5.687 8.75,5.687 8.75,0.887 23.25,0.887 23.25,-14.713
GND on Top Layer "GND_L02_P003" (solid, remove dead copper, pour order 8): 45.758,-14.676 45.758,-62.576 -43.142,-62.576 -43.142,47.424 12.358,47.424 12.358,31.195 0.283,31.195 0.283,5.724 8.758,5.724 8.758,0.924 23.258,0.924 23.258,-14.676

## Keep-outs
Keep-Out Layer:
  circle w0.254: c11.946,-7.518 r55

## Other copper
Top Layer:
  pour cut-out: 45.75,35.825 45.75,-55.275 66.95,-55.275 66.95,35.825
  pour cut-out: -37.25,-17.661 -37.25,-13.611 -35.1,-13.611 -35.1,-17.639
  region net GPS_PWR: -21.25,-46.475 -21.15,-46.375 -21.15,-43.775 -20.85,-43.475 -20.25,-43.475 -20.15,-43.375 -20.15,-41.075 -20.25,-40.975 -22.35,-40.975 -22.75,-41.375 -22.75,-44.875 -23.05,-45.175 -24.25,-45.175 -24.45,-45.375 -24.45,-46.275 -24.25,-46.475
  region net V_SOLAR: -20.65,-18.075 -20.4,-17.825 -20.4,-12.075 -20.65,-11.825 -29.9,-11.825 -30.275,-12.2 -30.275,-14.7 -30.9,-15.325 -34.65,-15.325 -34.9,-15.575 -34.9,-17.825 -34.65,-18.075
  region net V_BAT: -40.65,0.175 -41.15,-0.325 -41.15,-6.575 -40.65,-7.075 -28.65,-7.075 -28.4,-6.825 -28.4,-0.075 -28.65,0.175
  region net V_SYSTEM: -12.65,-6.825 -18.65,-6.825 -20.4,-8.575 -20.4,-9.575 -20.65,-9.825 -22.65,-9.825 -22.9,-9.575 -22.9,-7.325 -22.65,-7.075 -21.4,-5.825 -21.4,-4.825 -20.65,-4.075 -12.65,-4.075 -12.4,-4.325 -12.4,-6.575
  region net V_BAT: -17.15,1.925 -17.65,2.425 -35.15,2.425 -37.65,-0.075 -36.15,-1.575 -29.15,-1.575 -27.4,0.175 -20.9,0.175 -20.65,-0.075 -20.65,-1.825 -20.4,-2.075 -17.4,-2.075 -17.15,-1.825
  region net NetD800_2: -24.4,-0.325 -22.4,-0.325 -21.9,-0.825 -21.9,-4.775 -22.1,-4.975 -23.225,-4.975 -23.525,-4.675 -23.525,-2.75 -23.9,-2.375 -26.175,-2.375 -26.55,-2 -26.55,-0.425 -26.425,-0.3
  region net GPS_VCC: -23.825,-48.5 -24.25,-48.075 -24.25,-47 -24.1,-46.85 -13.875,-46.85 -13.05,-47.675 -10.825,-47.675 -10.7,-47.8 -10.7,-48.425 -10.775,-48.5
  region net 3.3V: -3.625,-37.9 -3.55,-37.975 -1.475,-37.975 -1.125,-37.625 -1.125,-27.1 -1.25,-26.975 -3.5,-26.975 -3.625,-27.1
  region net VOUT: -15.425,-30.05 -16.875,-30.05 -16.95,-29.975 -16.95,-28.175 -16.775,-28 -13.65,-28 -13.45,-28.2 -13.45,-30 -13.525,-30.075
  region net 3.3V: 11.9,-27.475 11.675,-27.7 11.675,-29.35 11.875,-29.55 14.175,-29.55 14.45,-29.275 16,-27.725 16.775,-27.725 16.825,-27.675 16.825,-27.525 16.775,-27.475
  region net 3.3V: 17.775,-17.325 17.6,-17.15 15.4,-17.15 15.05,-17.5 15.05,-19.575 15.9,-20.425 17.1,-20.425 17.525,-20.85 17.525,-21.275 17.575,-21.325 17.725,-21.325 17.775,-21.275
  region net GND: 18.025,-17.275 18.1,-17.2 19.175,-17.2 19.3,-17.325 19.3,-19.125 19.15,-19.275 18.6,-19.275 18.275,-19.6 18.275,-21.2 18.175,-21.3 18.125,-21.3 18.025,-21.2
  region net 3.3V: 15.05,-19.575 15.05,-19.775 15.35,-20.075 15.85,-20.075
  region net 3.3V: 15.9,-20.425 11.1,-20.425 11.05,-20.375 11.05,-19.8 11.25,-20 15.475,-20
  region net GND: 9.95,-27.225 9.75,-27.025 9.75,-26.225 9.95,-26.025 14.6,-26.025 14.95,-26.375 14.95,-26.75 15.175,-26.975 16.85,-26.975 16.875,-27 16.65,-27.225 16.525,-27.225
  region net GND: -32.2,5.075 -32,4.875 -31.6,5.275 -31.6,9.05 -31.7,9.15 -32.1,9.15 -32.2,9.05
  region net LED_VCC: -28.075,18.725 -28.825,17.975 -28.825,11.3 -28.75,11.225 -25.3,11.225 -25.025,11.5 -25.025,16.225 -23.525,17.725 -17.225,17.725 -17.15,17.8 -17.15,18.675 -17.2,18.725
  region net LED_VCC: -25.3,10.3 -25.025,10.575 -25.025,11.5 -25.45,11.925 -31.25,11.925 -31.325,11.85 -31.325,10.375 -31.25,10.3
  region net LED_VCC: -29.55,11.7 -28.55,12.7 -27.95,12.7 -27.95,11.525 -28.35,11.125
  region net VIN: -31.25,4.9 -31.05,4.7 -25.45,4.7 -25.075,5.075 -25.075,8.95 -25.175,9.05 -31.25,9.05
  region net VIN: -34.65,10.225 -34.95,10.525 -34.95,13.625 -34.65,13.925 -32.65,13.925 -32.45,13.725 -32.45,10.425 -32.65,10.225
  region net VIN: -16.05,-2.075 -6.95,-2.075 -6.35,-1.475 -6.35,1.625 -6.65,1.925 -16.15,1.925 -16.35,1.725 -16.35,-1.775
  region net LED_VCC: -19.8,33.5 -22.625,33.5 -25.25,30.875 -25.25,28.875 -24.8,28.425 -17.525,28.425 -16.825,29.125 -16.825,33.3 -17.05,33.525
  region net NetD600_1: -14.8,20.45 -13.925,21.325 -13.925,25.775 -10.925,28.775 -10.925,33.45 -10.75,33.625 -6.8,33.625 -6.375,33.2 -6.375,29.475 -6.025,29.125 -2.175,29.125 -2.05,29 -2.05,15.2 -2.6,14.65 -13.4,14.65 -13.925,15.175 -13.925,18.5 -14.825,19.4 -20.75,19.4 -20.85,19.5 -20.85,20.325 -20.725,20.45
  region net LED_PWR: -4.45,37.025 -3.95,37.525 -2.05,37.525 -1.75,37.225 -1.75,34.425 -1.25,33.925 4.95,33.925 5.75,34.725 5.75,36.525 6.05,36.825 8.85,36.825 8.85,31.825 8.25,31.225 -4.45,31.225
  region net LED_PWR: 4.25,34.625 3.25,33.625 3.85,33.025 7.65,33.025 8.85,34.225 8.85,38.225 8.45,38.625 6.425,38.625 5.425,39.625 4.25,39.625
  region net NetP600_1: 10.75,41.625 11.65,42.525 11.65,46.225 12.25,46.825 15.95,46.825 16.45,46.325 16.45,42.925 17.85,41.525 17.85,34.425 17.75,34.325 10.85,34.325 10.75,34.425
  pour cut-out: 17.326,34.066 9.218,34.066 9.109,34.175
  pour cut-out: -26.886,-6.288 -26.886,-11.566 -22.749,-11.566 -22.749,-6.189 -26.787,-6.189
  pour cut-out: -28.846,-10.079 -28.846,-9.825 -26.9,-9.825 -26.9,-10.079
  pour cut-out: -20.396,-19.921 -36.088,-19.921 -36.088,-23.115 -20.396,-23.115 -20.396,-20.362
  pour cut-out: -3.884,-29.586 -17.336,-29.586 -17.336,-32.01 -3.884,-32.01
  pour cut-out: -13.551,-27.761 -17.336,-27.761 -17.336,-29.586 -13.191,-29.586
  pour cut-out: -12.626,-40.921 -20.907,-40.921 -20.907,-47.416 -12.626,-47.416
  pour cut-out: -4.246,-51.071 -6.346,-51.071 -6.346,-54.079 -4.246,-54.079
  pour cut-out: -10.846,13.479 -10.846,13.637 -18.826,13.637 -18.826,13.425 -18.4,13.425
  pour cut-out: -20.636,13.439 -20.636,19.141 -13.709,19.141 -13.709,13.439 -19.384,13.439
  pour cut-out: -22.154,21.725 -22.154,18.925 -16.961,18.925 -16.961,21.725
  pour cut-out: -24.766,10.575 -24.766,4.175 -31.504,4.175 -31.504,10.575
  pour cut-out: -29.432,12.184 -35.096,12.184 -35.096,8.789 -31.504,8.789 -31.504,9.291
  region net GND: -31.509,8.789 -31.509,9.15 -32.296,9.15 -32.296,8.789
  pour cut-out: -36.346,9.829 -38.704,9.829 -38.704,8.721 -36.346,8.721
  pour cut-out: -33.404,7.761 -37.525,7.761 -37.525,8.829 -35.096,8.829
  pour cut-out: -19.15,37.425 -19.15,26.675 -8.65,26.675 -8.65,37.425
  pour cut-out: -16.961,22.379 -22.154,22.379 -22.154,18.984
  pour cut-out: 9.571,-22.212 9.571,-19.51 13.336,-19.51 13.336,-21.712
  pour cut-out: 18.102,-17.129 19.35,-17.129 19.35,-16.325 18.102,-16.325
  pour cut-out: 35.479,-17.596 35.479,-25.054 31.654,-25.054 31.654,-17.596
  pour cut-out: 31.654,-26.446 40.129,-26.446 40.129,-32.054 31.654,-32.054
  pour cut-out: -21.664,12.476 -21.664,17.466 -20.636,17.466 -20.636,12.476
  pour cut-out: -30.554,-10.079 -30.554,-0.211 -23.784,-0.211 -23.784,-10.079
  pour cut-out: -36.504,-9.425 -36.504,-7.325 -30.4,-7.325 -30.4,-8.89 -35.9,-8.89 -35.9,-8.821
  region net NetC200_1: -8.95,-12.475 -8.05,-13.375 -8.05,-18.275 -7.85,-18.475 -4.95,-18.475 -4.85,-18.375 -4.85,-11.675 -6.05,-10.475 -8.95,-10.475
  region net VOUT: -2.45,-13.275 -2.25,-13.075 1.25,-13.075 1.45,-13.275 1.45,-24.675 1.35,-24.775 -2.35,-24.775 -2.45,-24.675
  region net NetC204_1: 1.825,-9.45 1.9,-9.525 1.9,-11.775 1.875,-11.8 1.225,-11.8 1.15,-11.725 1.15,-10.45 0.9,-10.2 -1.475,-10.2 -1.525,-10.15 -1.525,-9.475 -1.5,-9.45
  region net NetC204_1: -11.45,-7.125 -11.9,-7.575 -15.4,-7.575 -15.65,-7.825 -15.65,-10.875 -15.45,-11.075 -11.65,-11.075 -9.85,-9.275 -9.85,-6.475 -7.85,-4.475 -7.85,-2.975 -7.95,-2.875 -11.35,-2.875 -11.45,-2.975
  pour cut-out: -1.751,-6.662 -1.751,-10.557 0.891,-10.557 0.891,-6.662
  pour cut-out: -6.954,-3.771 -6.954,-6.129 -4.846,-6.129 -4.846,-5.021 -5.846,-5.021 -5.846,-3.771
  pour cut-out: -19.15,28.166 -30.65,28.166 -30.65,37.425 -19.15,37.425
  pour cut-out: -7.95,-12.475 -7.95,-19.175 0.75,-19.175 0.75,-12.475
  region net 3.3V: 14.65,-19.875 15.15,-19.375 15.55,-19.375 15.55,-20.175 15.45,-20.275
  region net NetC204_1: -8.35,-4.875 -8.35,-7.775 -10.05,-9.475 -10.65,-8.875 -10.65,-5.375
  region net NetC204_1: -10.35,-8.975 -8.45,-8.975 -8.35,-8.875 -8.35,-6.975
  pour cut-out: -5.55,-10.375 -8.35,-10.375 -8.35,-6.129 -5.55,-6.129
  pour cut-out: -11.95,-0.075 -11.95,-5.025 -7.5,-5.025 -7.5,-0.075
  pour cut-out: -12.15,-7.084 -12.15,2.525 -22.095,2.525 -22.095,-7.084
  pour cut-out: -5.846,-2.771 -5.846,2.525 -12.15,2.525 -12.15,-2.771
  pour cut-out: -15.189,-8.576 -15.189,-2.334 -12.15,-2.334 -12.15,-8.576
  pour cut-out: -22.408,-27.803 -22.408,-30.771 -18.364,-30.771 -18.364,-27.803
  pour cut-out: -26.6,-27.803 -29.95,-27.803 -29.95,-28.911 -26.6,-28.911
  pour cut-out: -38.954,4.979 -38.954,2.479 -37.317,2.479 -37.317,4.979
  pour cut-out: 5.814,41.279 5.814,34.675 10.491,34.675 10.491,41.279
  pour cut-out: 2.307,34.184 3.991,34.184 3.991,34.732 2.307,34.732
  pour cut-out: 29.846,-40.621 29.846,-42.987 36.764,-42.987 36.764,-38.021 29.865,-38.021
  region net 3.3V: 23.025,-30.1 23.1,-30.175 26.775,-30.175 27.05,-30.45 27.05,-31.15 27.125,-31.225 27.55,-31.225 27.675,-31.1 27.675,-29.425 27.325,-29.075 23.375,-29.075 23.275,-28.975 23.275,-28.475 23.225,-28.425 23.05,-28.425 23.025,-28.45 23.025,-28.85
  pour cut-out: 31.654,-31.379 28.988,-31.379 28.988,-29.39 31.654,-29.39
  pour cut-out: 25.546,-31.063 25.546,-31.484 28.046,-31.484 28.046,-31.063
  pour cut-out: 31.654,-20.021 29.654,-20.021 29.654,-20.849 31.654,-20.849
  pour cut-out: -10.254,-55.929 -10.254,-51.389 -6.346,-51.389 -6.346,-55.929 -8.046,-55.929
  pour cut-out: -32.754,-8.89 -32.754,-9.079 -30.554,-9.079 -30.554,-8.89
  pour cut-out: 0.105,34.184 0.105,37.221 1.304,37.221 1.304,34.184
  pour cut-out: 2.504,41.129 2.504,39.421 5.814,39.421 5.814,41.129
  pour cut-out: 5.814,41.279 0.996,41.279 0.996,39.421 5.814,39.421
  pour cut-out: -0.109,10.929 -0.109,8.925 0.15,8.925 0.15,10.67
  pour cut-out: -10.55,-12.134 -9.204,-12.134 -9.204,-9.271 -10.55,-9.271
  region net NetC200_1: -10.05,-10.475 -10.9,-11.325 -10.9,-15.575 -10.65,-15.825 -8.4,-15.825 -7.9,-16.325 -7.4,-15.825 -7.4,-10.575 -7.5,-10.475
Bottom Layer:
  region net VOUT: 7.85,3.425 6.75,3.425 6.55,3.225 6.55,-0.175 7.1,-0.175 8.4,1.125
  region net VOUT: 8.4,1.125 8.4,3.075 8.05,3.425 7.85,3.425
  region net VOUT: 8.4,1.125 8.4,0.475 7.25,-0.675 7.05,-0.475 7.05,2.325

## Silkscreen, mask and mechanical layers (free items; w line width, h text height)
Top Overlay:
  circle w0.254: c4.9,26.7 r2.644
  circle w0.254: c55.125,-32.85 r2.644
  circle w0.254: c55.1,19.675 r2.644
  lines w0.254: 0.05,12.5 5.892,12.5 ; 5.892,0.054 5.892,5.515 ; 9.575,0.054 9.575,5.515 ; 23.75,-9.607 30.534,-9.607 ; 30.525,-14.525 30.525,-9.607 30.534,-9.607 ; 30.55,-9.607 30.534,-9.607 ; 45.875,-50.831 45.875,-14.55 23.75,-14.55 23.75,0 0,0 0,33.525 28.45,33.525 29.65,33.525 48.425,33.525 ; 45.875,-50.831 ccw(c11.605,-7.532) 48.472,33.577
  text "LED-" at -1.475,43.2 h3.2
  text "LED+" at 17.025,43.2 h3.2
  text "12V" at -14.949,1.069 h2.5 r90
  text "24V" at -10.373,1.069 h2.5 r90
  text "BAT+" at -42.3,-1.625 h2
  text "LED CTRL" at 22.806,-13.488 h2 r90
  text "BAT-" at -42.3,-14.3 h2
  text "ĐT: 0913519133" at 60.775,-19.175 h3.3 r90
  text "EMAIL: matecohp@gmail.com" at 55.8,-28.125 h3.3 r90
  text "TOP" at -31.65,-32.575 h2
  text "CÔNG TY TNHH TƯ VẤN VÀ CÔNG NGHỆ HÀNG HẢI" at 53.425,-48.45 h3.3 r90

## Text inside footprints (layer, text, board x,y; h text height)
C503: Top Overlay "+" at -4.658,-54.725 h2 r180
P100: Top Overlay "8" at 35.558,-35.451 h1.27 r90; Top Overlay "7" at 38.098,-35.451 h1.27 r90; Top Overlay "1" at 38.098,-46.627 h1.27 r90; Top Overlay "2" at 35.558,-47.135 h1.27 r90